# Altium PCB Carrier_Board_pcb.PcbDoc (part 1 of 2)
Units mm, origin at the board's own origin, x right, y up, seen from the top; angles counter-clockwise.
Board outline 152.4 x 101.6 mm, 4 copper layers (Top Layer, Power, Ground, Bottom Layer), stack 0.603 mm thick; 85 components, 79 nets, 632 pads, 232 vias.
Unrouted connection lines stored in the file: 1.
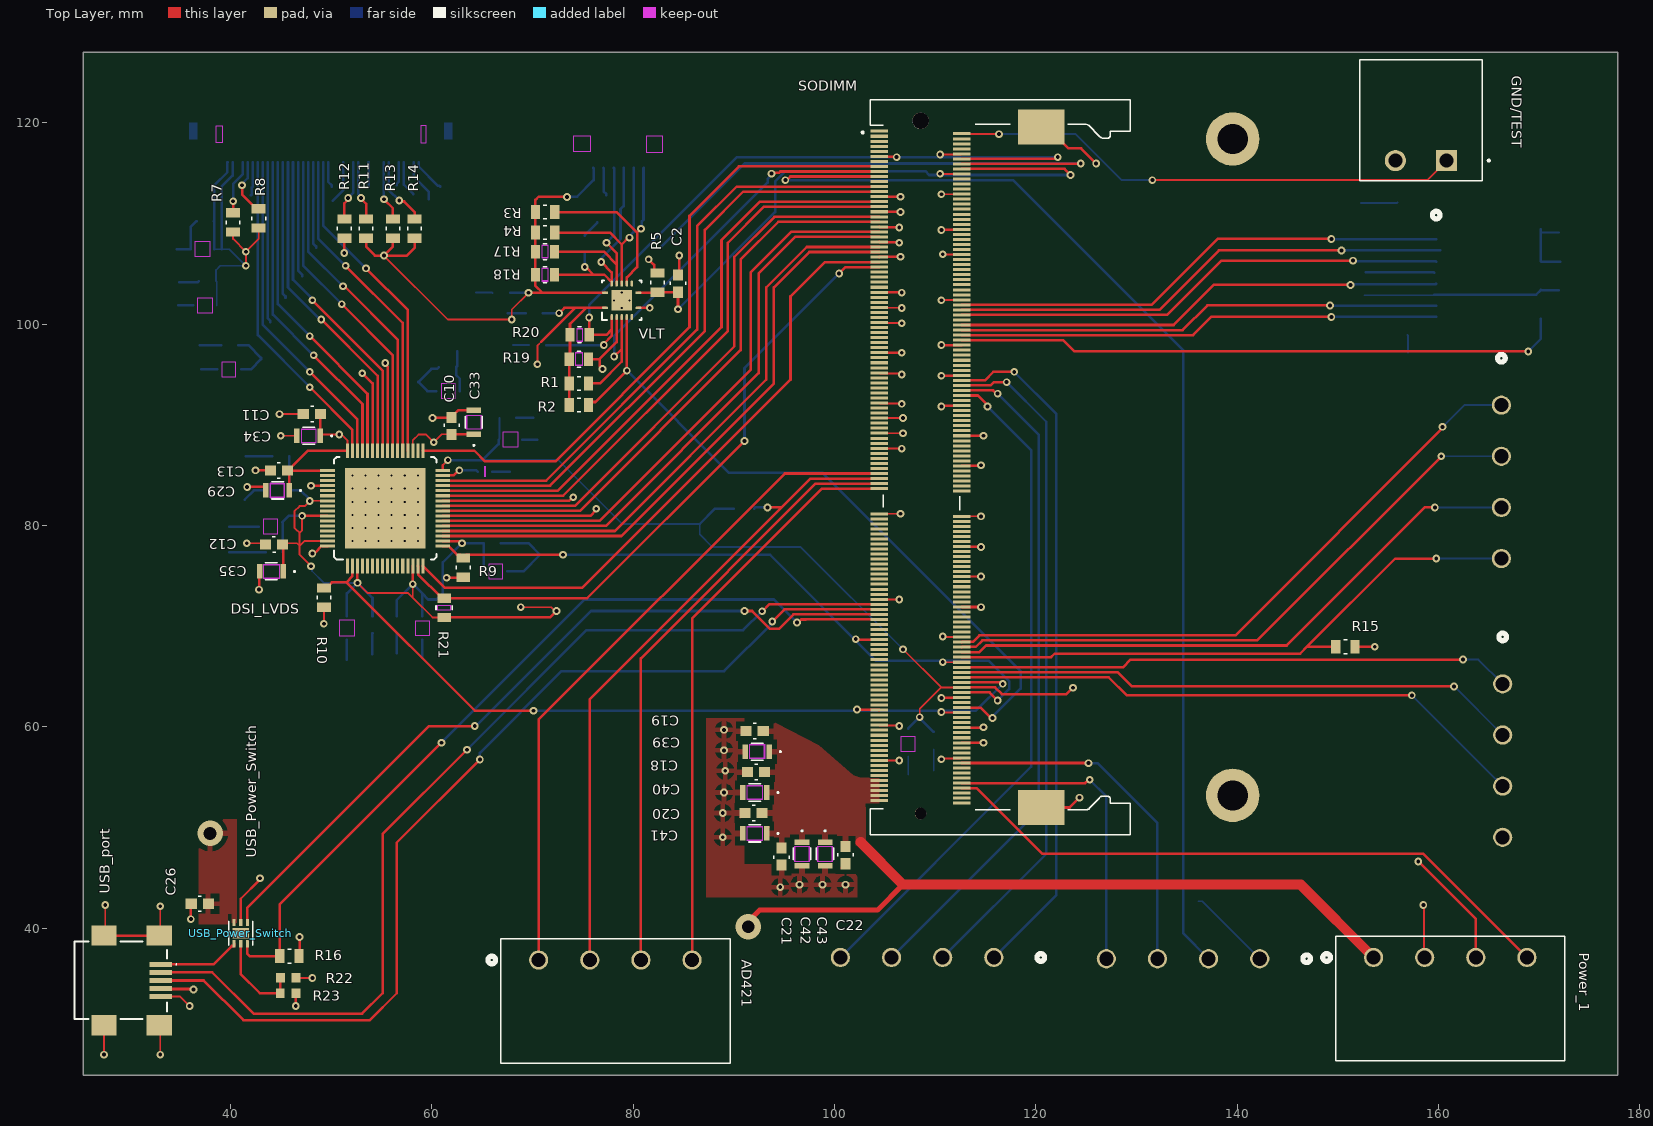
[diagram p0: Top Layer view]
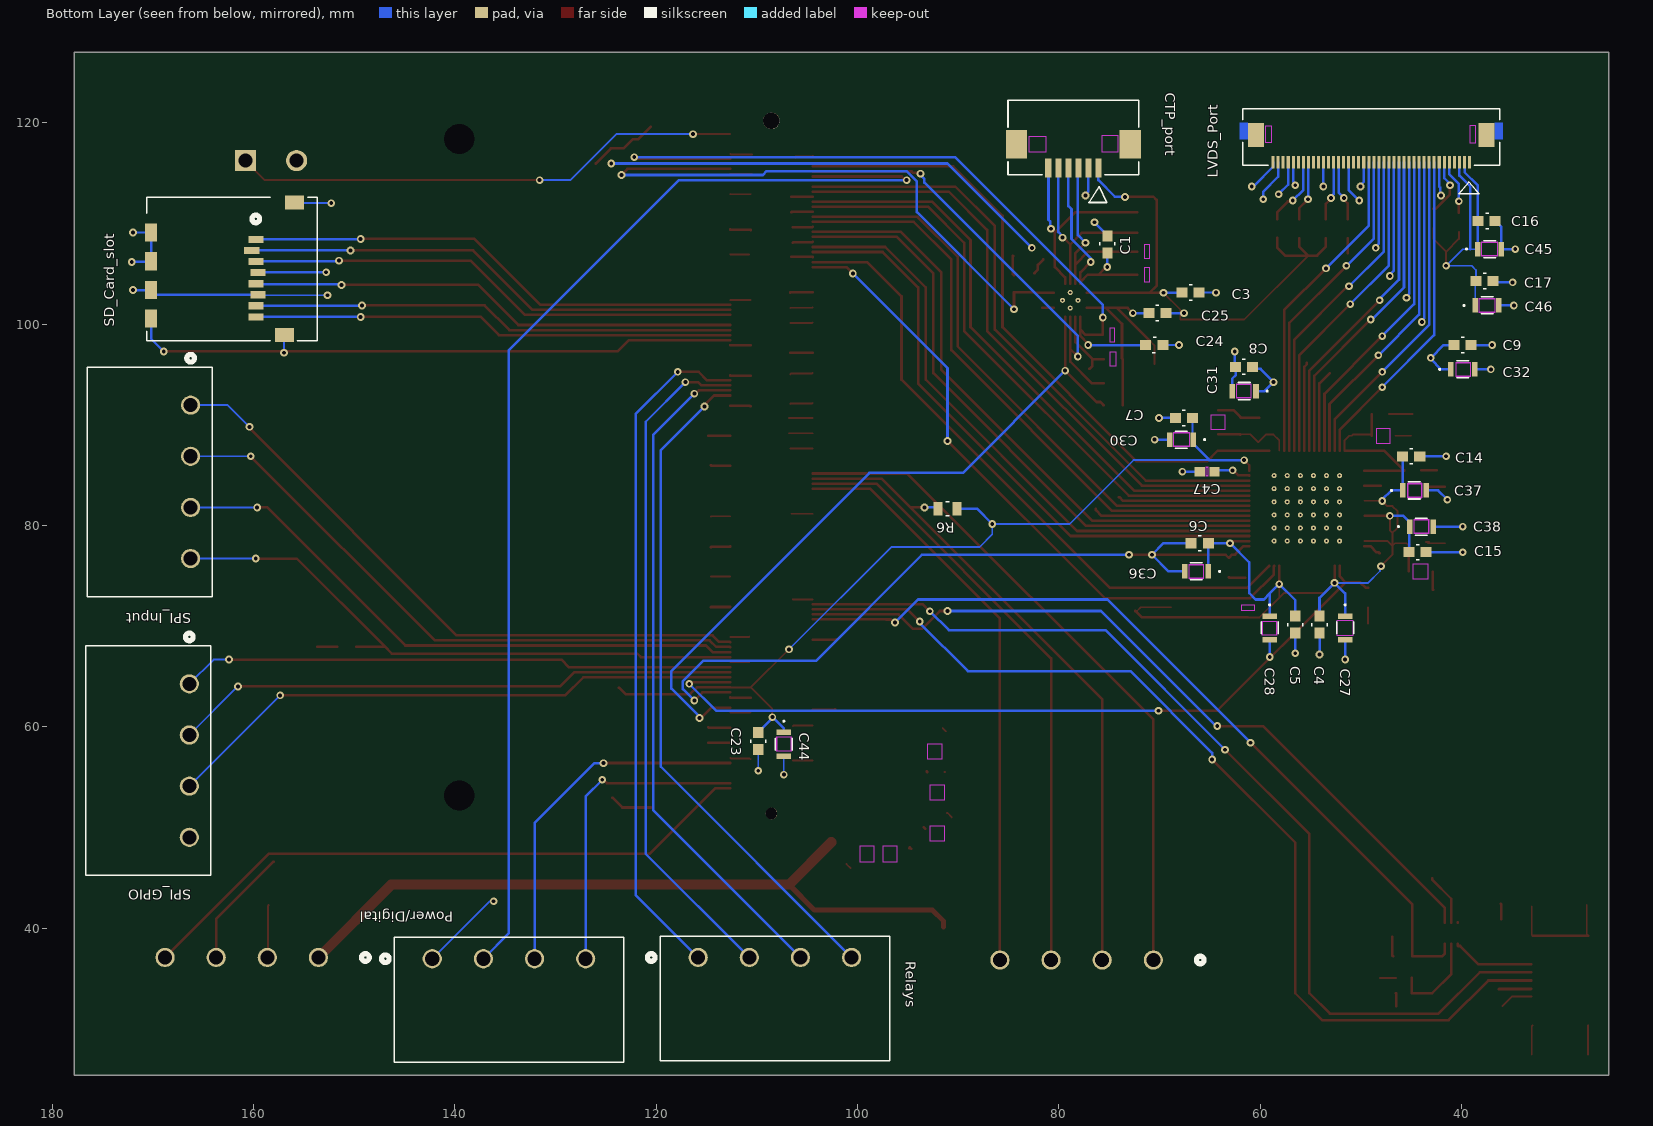
[diagram p1: Bottom Layer view, seen from below]
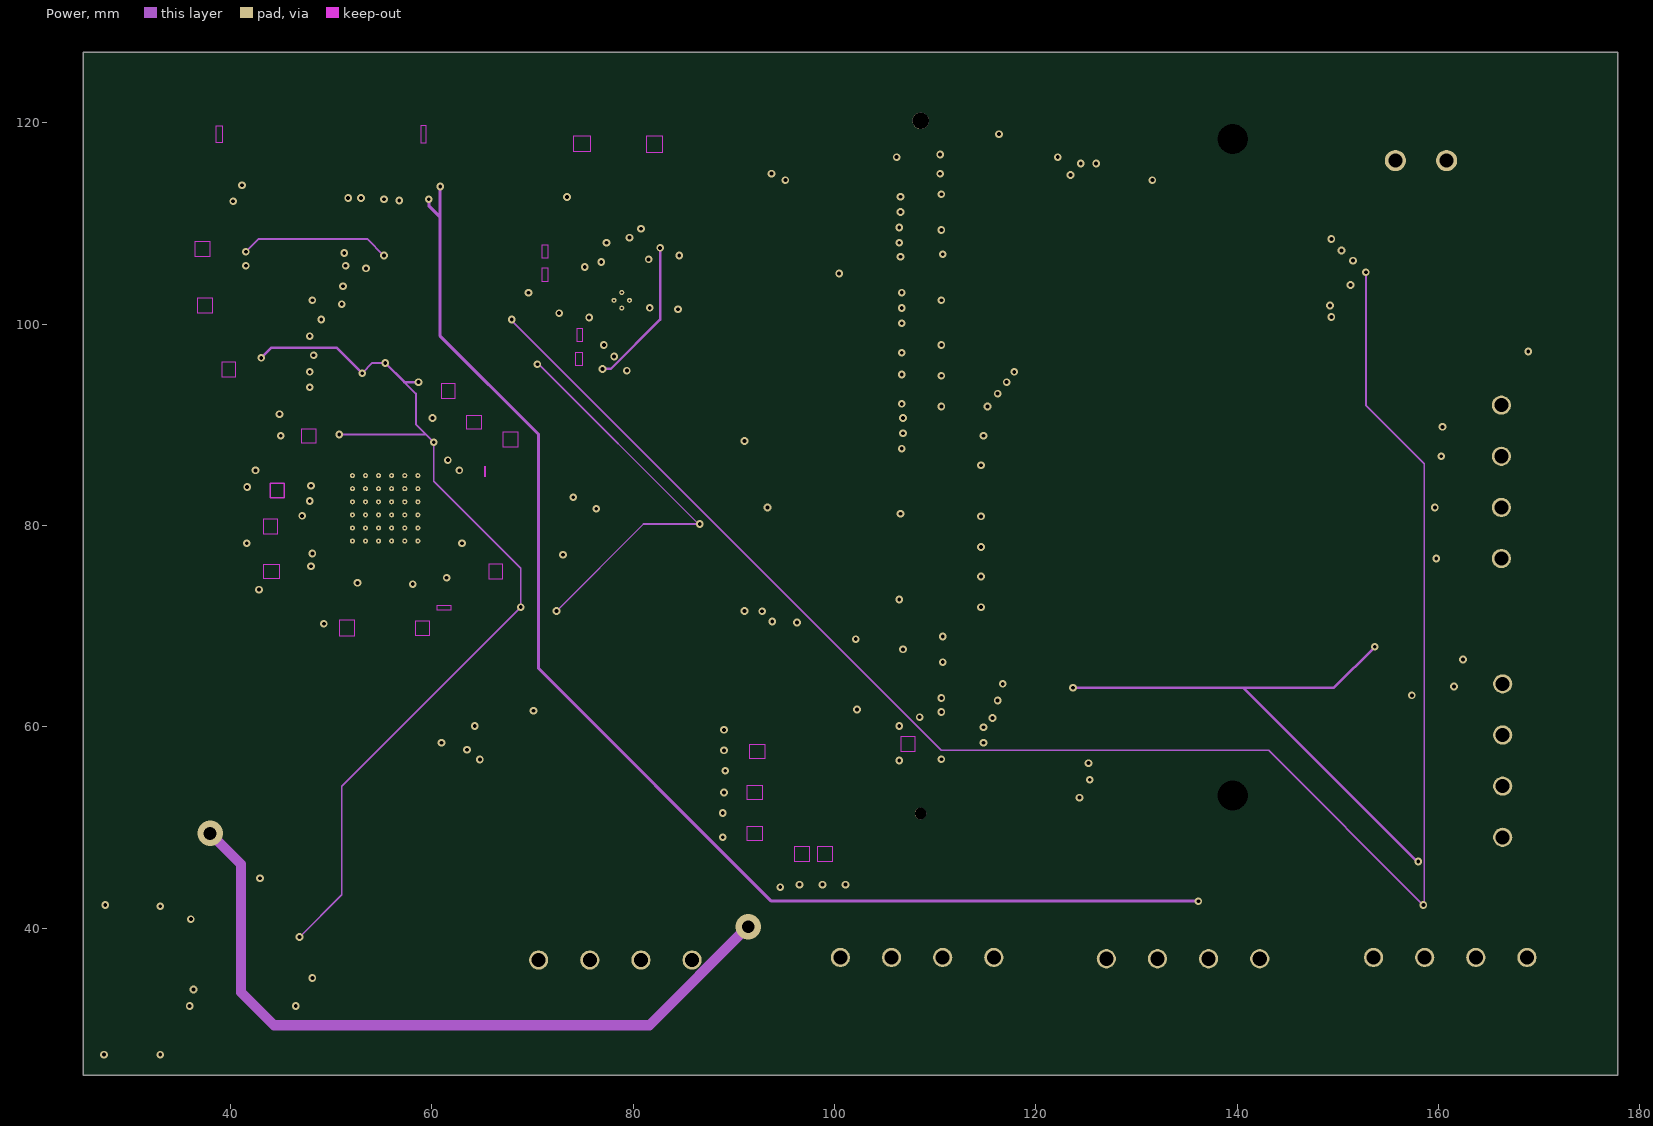
[diagram p2: Power]
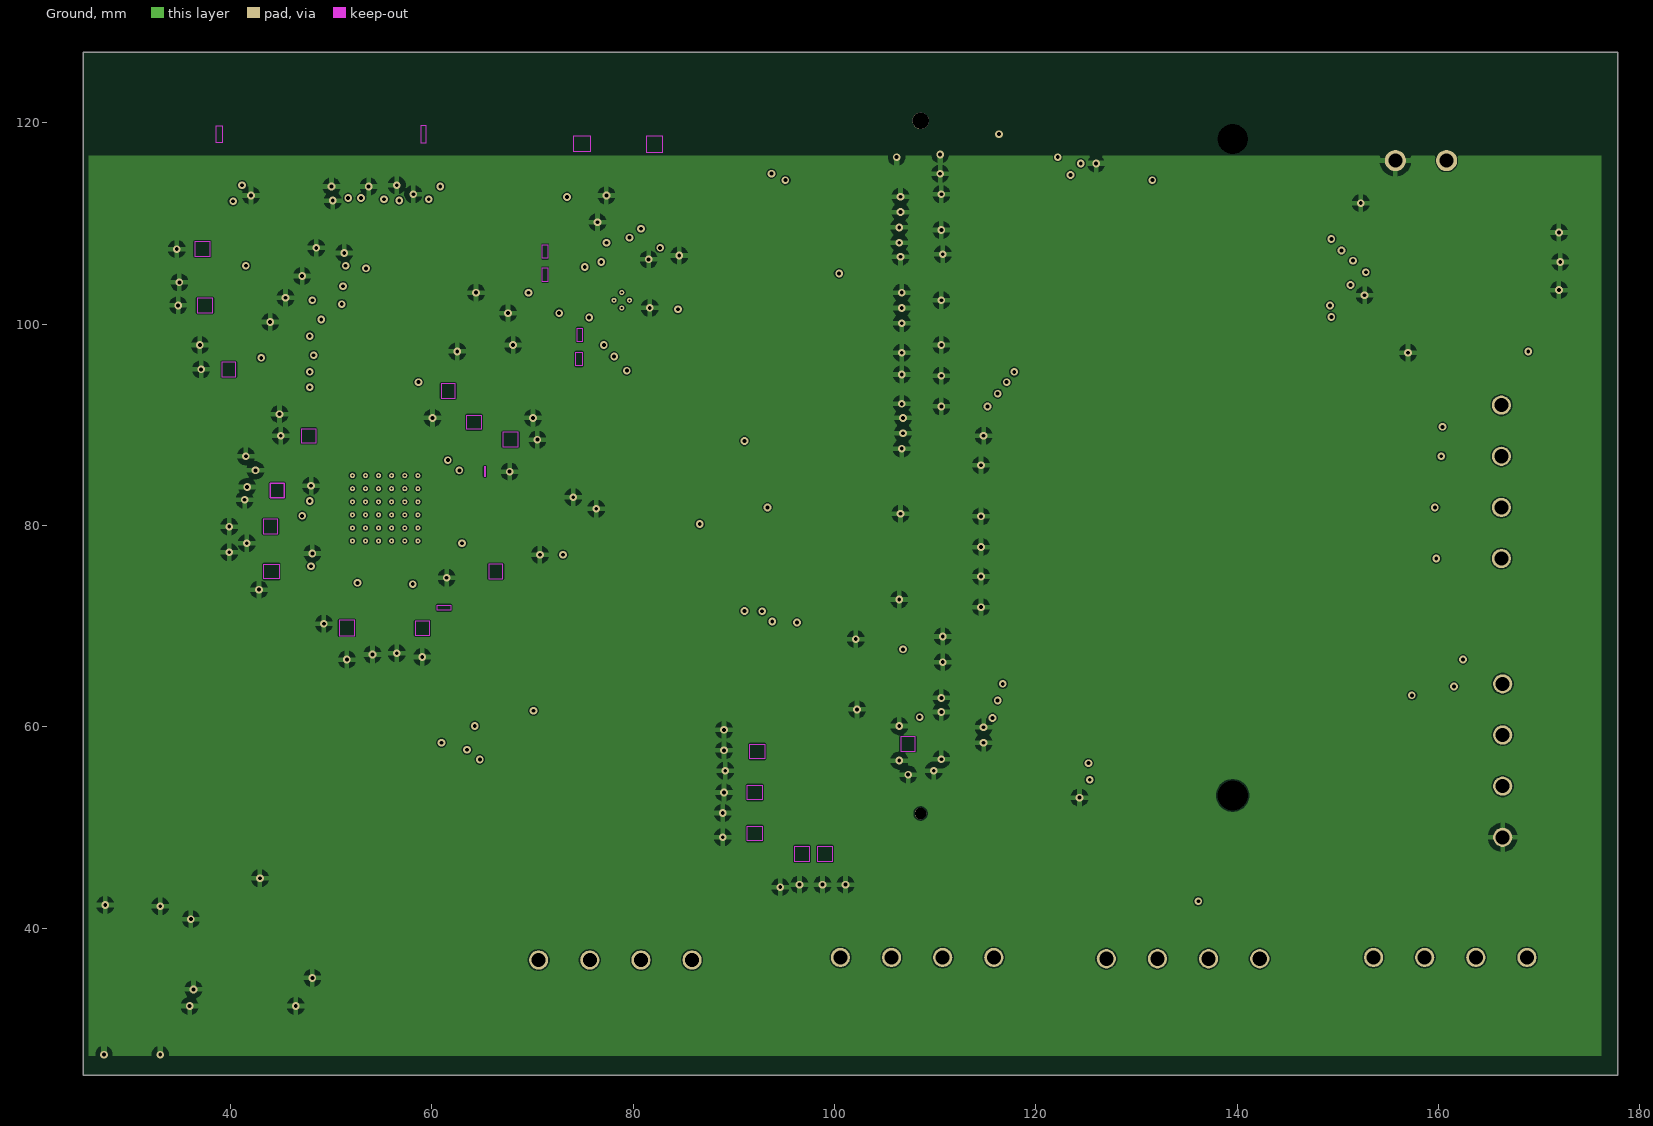
[diagram p3: Ground]
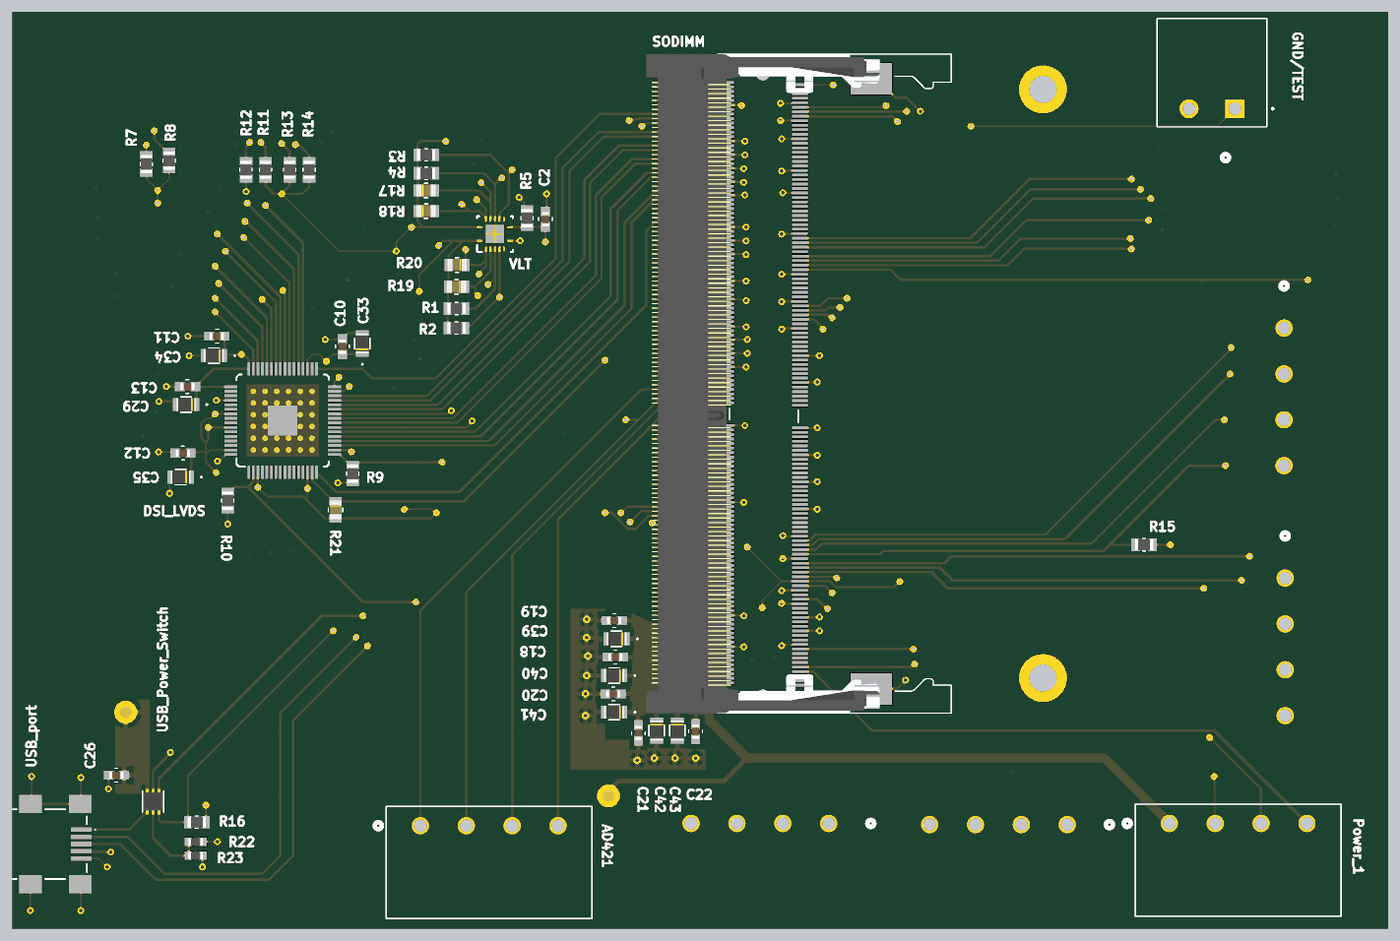
[diagram p5: 3D render of the assembled board from above, using the file's embedded part models]
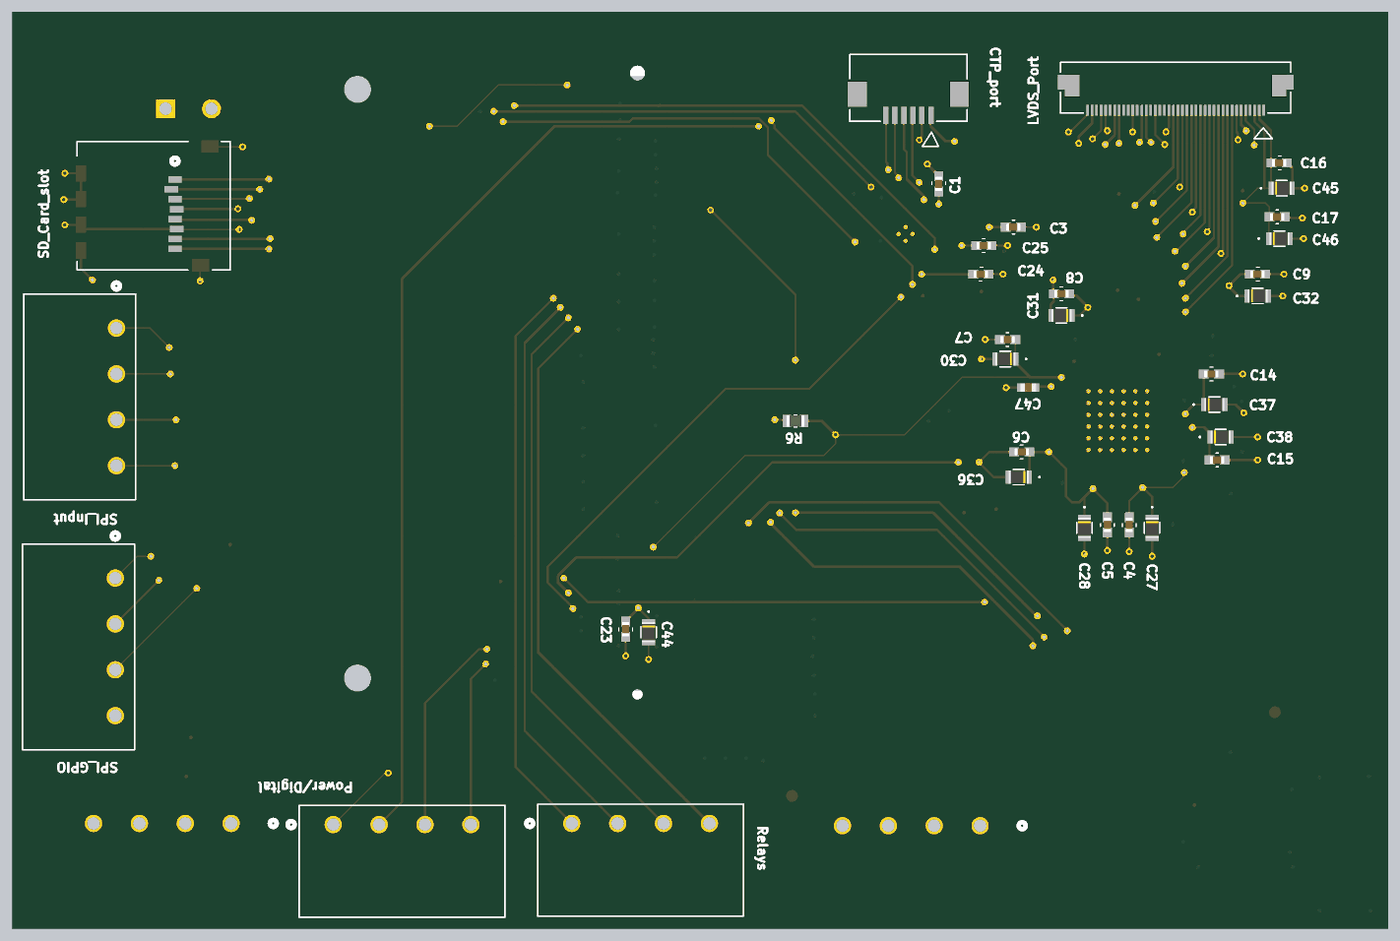
[diagram p6: 3D render of the assembled board from below, using the file's embedded part models]

## Layer stack, top to bottom
Top Solder: solder mask 0.0102, Solder Resist, Dk 3.5
Top Layer: signal copper 0.0356
Dielectric 2: prepreg 0.0711, PP-006, Dk 4.1
Power: signal copper 0.035
Dielectric 1: dielectric 0.32, FR-4, Dk 4.8
Ground: signal copper 0.035
Dielectric 3: prepreg 0.0711, PP-006, Dk 4.1
Bottom Layer: signal copper 0.0356
Bottom Solder: solder mask 0.0102, Solder Resist, Dk 3.5

## Board outline
25.4,25.4 177.8,25.4 177.8,127 25.4,127

## Design rules (kind name [scope] priority, off if disabled: settings)
Clearance Clearance_PolyTopGnd [InNamedPolygon('TOP-GND') OR InNamedPolygon('IL1-PWR') OR InNamedPolygon('IL2-GND') OR InNamedPolygon('BOT-GND')] p1: gap=0.508 ignorepadtopadclearanceinfootprint=FALSE
Clearance [All] p2: gap=0.127 ignorepadtopadclearanceinfootprint=FALSE
ComponentClearance [All] p1 off: gap=0.254 collisioncheckmode=3 verticalgap=0.254 showdistances=FALSE
DiffPairsRouting [All] p1: maxlimit=0.254 minlimit=0.127 mostfreqgap=0.254 toplayer_minwidth=0.127 toplayer_maxwidth=0.381 toplayer_prefwidth=0.254 midlayer1_minwidth=0.127 midlayer1_maxwidth=0.381 midlayer1_prefwidth=0.254 midlayer2_minwidth=0.127 midlayer2_maxwidth=0.381 midlayer2_prefwidth=0.254 bottomlayer_minwidth=0.127 bottomlayer_maxwidth=0.381 bottomlayer_prefwidth=0.254 maxuncoupledlength=12.7
FabricationTestPointUsage TestPointUsage [All] p2: valid=0 allowmultiple=FALSE
FabricationTestpoint Testpoint [All] p2: side=3 testpointundercomponent=TRUE minsize=1.016 maxsize=2.54 preferedsize=1.524 minholesize=0.508 maxholesize=1.016 preferedholesize=0.813 testpointgrid=0.025 allowsidetop=TRUE allowsidebottom=TRUE usegrid=TRUE gridtolerance=0
Height [All] p1 off: minheight=0 maxheight=25.4 prefheight=12.7
HoleSize HoleSize_FIDUCIAL [(InPadClass('FIDUCIAL ROUND'))] p1: absolutevalues=TRUE maxlimit=2.54 minlimit=0 maxpercent=80.000 minpercent=20.000
HoleSize [All] p2: absolutevalues=TRUE maxlimit=20.32 minlimit=0.3 maxpercent=80.000 minpercent=20.000
MatchedLengths MatchedLengths_CAM [InNetClass('LVDSCAM0')] p1: tolerance=0.254 checknetsindiffpair=FALSE checkdiffpairvsdiffpair=TRUE checkxsignals=TRUE checkothers=TRUE
PlaneClearance [All] p1: clearance=0.635
PlaneConnect [All] p1: planeconnectstyle=Direct reliefexpansion=0.508 reliefentries=4 reliefconductorwidth=0.381 reliefairgap=0.254
PolygonConnect [All] p1: connectstyle=Relief reliefconductorwidth=0.508 reliefentries=4 polygonreliefangle="90 Angle" airgapwidth=0.508
RoutingVias [All] p1: holewidth=0.711 width=1.27 viastyle="Through Hole" minholewidth=0.711 minwidth=1.27 maxholewidth=0.711 maxwidth=1.27
SilkToSolderMaskClearance SilkscreenOverComponentPads [IsPad] p2: minsilkscreentomaskgap=0.254 clearancetoexposedcopper=TRUE
SolderMaskExpansion [All] p1: expansion=0.038 istentingtop=FALSE
SupplyNets "Schematic Supply Nets_1" [InNet('GND')] p1: voltage=0.000
Width [All] p1: maxlimit=12.7 minlimit=0.127 preferedwidth=0.178
24 further rules are at their usual default settings.

## Components (designator, comment, footprint, x,y, rotation, side; value= is the part's Value field where it differs from the comment)
AD421 "1757268" CONN_1757268_PXC 70.612,36.83 r0 top
C1 "100n" CAPC1608X90 75.184,107.911 r270 bottom
C2 "100n" CAPC1608X90 84.455,104.013 r270 top
C3 "100n" CAPC1608X90 66.929,103.124 r0 bottom
C4 "100n" CAPC1608X90 54.105,70.146 r270 bottom
C5 "100n" CAPC1608X90 56.515,70.143 r270 bottom
C6 "100n" CAPC1608X90 66.001,78.232 r0 bottom
C7 "100n" CAPC1608X90 67.564,90.678 r0 bottom
C8 "100n" CAPC1608X90 61.595,95.758 r0 bottom
C9 "100n" CAPC1608X90 39.91,97.917 r180 bottom
C10 "100n" CAPC1608X90 61.976,89.877 r90 top
C11 "100n" CAPC1608X90 48.08,91.059 r180 top
C12 "100n" CAPC1608X90 44.323,78.105 r180 top
C13 "100n" CAPC1608X90 44.831,85.471 r180 top
C14 "100n" CAPC1608X90 45,86.865 r180 bottom
C15 "100n" CAPC1608X90 44.362,77.343 r180 bottom
C16 "100n" CAPC1608X90 37.504,110.236 r0 bottom
C17 "100n" CAPC1608X90 37.719,104.267 r0 bottom
C18 "100n" CAPC1608X90 92.202,55.499 r180 top
C19 "100n" CAPC1608X90 92.075,59.563 r180 top
C20 "100n" CAPC1608X90 91.948,51.435 r180 top
C21 "100n" CAPC1608X90 94.742,47.117 r270 top
C22 "100n" CAPC1608X90 101.092,47.244 r270 top
C23 "100n" CAPC1608X90 109.855,58.586 r270 bottom
C24 "100n" CAPC1608X90 70.524,97.917 r0 bottom
C25 "100n" CAPC1608X90 70.192,101.092 r0 bottom
C26 "100n" CAPC1608X90 36.957,42.418 r0 top
C27 "10u" CAP_2012_TDK 51.562,69.818 r270 bottom
C28 "10u" CAP_2012_TDK 59.055,69.815 r270 bottom
C29 "10u" CAP_2012_TDK 44.672,83.475 r180 top
C30 "10u" CAP_2012_TDK 67.818,88.519 r0 bottom
C31 "10u" CAP_2012_TDK 61.595,93.345 r0 bottom
C32 "10u" CAP_2012_TDK 39.878,95.504 r180 bottom
C33 "10u" CAP_2012_TDK 64.177,90.244 r90 top
C34 "10u" CAP_2012_TDK 47.752,88.9 r180 top
C35 "10u" CAP_2012_TDK 44.069,75.438 r180 top
C36 "10u" CAP_2012_TDK 66.329,75.438 r0 bottom
C37 "10u" CAP_2012_TDK 44.672,83.475 r180 bottom
C38 "10u" CAP_2012_TDK 43.977,79.883 r180 bottom
C39 "10u" CAP_2012_TDK 92.329,57.531 r180 top
C40 "10u" CAP_2012_TDK 92.075,53.467 r180 top
C41 "10u" CAP_2012_TDK 92.075,49.403 r180 top
C42 "10u" CAP_2012_TDK 96.774,47.371 r270 top
C43 "10u" CAP_2012_TDK 99.06,47.371 r270 top
C44 "10u" CAP_2012_TDK 107.315,58.258 r270 bottom
C45 "10u" CAP_2012_TDK 37.211,107.442 r180 bottom
C46 "10u" CAP_2012_TDK 37.465,101.854 r180 bottom
C47 "1u" CAPC17595_90N_KEM 65.278,85.344 r180 bottom
CTP_port "522710679" CON_522710679_MOL 78.551,118.556 r0 bottom locked
DSI_LVDS "SN65DSI83TPAPRQ1" PAP0064Q_N 55.362,81.697 r90 top locked
GND/TEST "1923869" PHOENIX_1923869 164.338,126.238 r180 top
LVDS_Port "541044031" CON_541044031_MOL 48.962,118.576 r0 bottom locked
Power/Digital "1757268" CONN_1757268_PXC 142.24,36.957 r180 bottom
Power_1 "1757268" CONN_1757268_PXC 153.543,37.084 r0 top
R1 "10k" RESC2012X60N 74.61,94.107 r180 top
R2 "10k" RESC2012X60N 74.61,91.948 r180 top
R3 "10k" RESC2012X60N 71.247,111.125 r180 top
R4 "10k" RESC2012X60N 71.247,109.093 r180 top
R5 "10k" RESC2012X60N 82.423,104.113 r90 top
R6 "10k" RESC2012X60N 91.059,81.661 r180 bottom
R7 "10k" RESC2012X60N 40.259,110.109 r90 top
R8 "10k" RESC2012X60N 42.799,110.49 r90 top
R9 "10k" RESC2012X60N 63.119,75.819 r90 top
R10 "10k" RESC2012X60N 49.276,72.832 r90 top
R11 "10k" RESC2012X60N 53.467,109.474 r90 top
R12 "10k" RESC2012X60N 51.308,109.474 r90 top
R13 "10k" RESC2012X60N 56.134,109.474 r90 top
R14 "10k" RESC2012X60N 58.293,109.474 r90 top
R15 "10k" RESC2012X60N 150.749,67.945 r180 top
R16 "10k" RESC2012X60N 45.847,37.211 r0 top
R17 "4.7k" RES_RC0805_YAG 71.247,107.188 r0 top
R18 "4.7k" RES_RC0805_YAG 71.247,104.902 r0 top
R19 "4.7k" RES_RC0805_YAG 74.612,96.52 r180 top
R20 "4.7k" RES_RC0805_YAG 74.676,98.933 r180 top
R21 "4.7k" RES_RC0805_YAG 61.214,71.819 r270 top
R22 "100k" RESC1608X55N 45.738,35.052 r0 top
R23 "100k" RESC1608X55N 45.72,33.528 r0 top
Relays "1757268" CONN_1757268_PXC 115.824,37.084 r180 bottom
SD_Card_slot "112A-TAAR-R03" CONN8_-TAAR-R03_ATT 159.766,108.413 r90 bottom
SODIMM "2309407-1" TE_2309407-1 108.549,85.783 r90 top locked
SPI_GPIO "1757268" CONN_1757268_PXC 166.37,64.262 r270 bottom
SPI_Input "1757268" CONN_1757268_PXC 166.243,91.948 r270 bottom
USB_port "651305142821" 651305142821 29.083,34.798 r270 top
USB_Power_Switch "TPS2553DDBVR" DRV6_1P6X1_TEX 41.021,39.497 r90 top
VLT "LSF0204RGYR" RGY0014A 78.867,102.362 r90 top locked

## Footprints (in the part's own frame and the unit in brackets; to place one, negate y for a bottom-side part, rotate by r counter-clockwise, add the part's x,y. Pads: shape width x height; smd on the part's side, far side on the other; paste and mask are expansions set on the pad)
651305142821 [mm]
  rect 0.5x2.25 smd: 1(-1.6,3.975) 2(-0.8,3.975) 3(0,3.975) 4(0.8,3.975) 5(1.6,3.975)
  rect 2x2.5 smd: 6(-4.45,3.85) 7(4.45,3.85) 8(-4.45,-1.65) 9(4.45,-1.65)
  silkscreen extent -3.85,-4.6 3.85,5.6
CAP_2012_TDK [mil]
  rect 21.78x57 smd paste+0 mask+0: 1(-46.39,0) 2(46.39,0)
  Top Layer keep-out region: -30,-30 -30,30 30,30 30,-30
  Keep-Out Layer region: -30,-30 -30,30 30,30 30,-30
  silkscreen extent -93,-34 23,34, body extent -44,-29 44,29, height 49
CAPC1608X90 [mm]
  rect 1.1x1 smd: 1(-0.85,0) 2(0.85,0)
  silkscreen extent -0.21,-0.76 0.09,0.76, body extent -0.8,-0.4 0.8,0.4, height 0.95
CAPC17595_90N_KEM [mm]
  rect 1x0.95 smd paste+0 mask+0: 1(-0.725,0) 2(0.725,0)
  Top Layer keep-out region: -0.064,-0.424 -0.063,0.424 0.064,0.424 0.063,-0.424
  Keep-Out Layer region: -0.064,-0.475 -0.063,0.475 0.064,0.475 0.063,-0.475
  body extent -0.87,-0.48 0.87,0.48, height 0.9
CON_522710679_MOL [mm]
  rect 0.6x1.9 smd paste+0: 1(-2.5,3.05) 2(-1.5,3.05) 3(-0.5,3.05) 4(0.5,3.05) 5(1.5,3.05) 6(2.5,3.05)
  rect 2.1x2.8 smd paste+0 mask+0.076: P1(-5.65,0.7) P2(5.65,0.7)
  Keep-Out Layer region: 2.73,-0.1 2.73,1.5 4.38,1.5 4.38,-0.1
  Keep-Out Layer region: -2.796,-0.138 -2.796,1.462 -4.446,1.462 -4.446,-0.138
  silkscreen extent -6.5,-3.7 6.5,6.48
CON_541044031_MOL [mm]
  rect 0.3x1.2 smd paste+0: 1(-9.75,2.498) 2(-9.25,2.498) 3(-8.75,2.498) 4(-8.25,2.498) 5(-7.75,2.498) 6(-7.25,2.498) 7(-6.75,2.498) 8(-6.25,2.498) 9(-5.75,2.498) 10(-5.25,2.498) 11(-4.75,2.498) 12(-4.25,2.498) 13(-3.75,2.498) 14(-3.25,2.498) 15(-2.75,2.498) 16(-2.25,2.498) 17(-1.75,2.498) 18(-1.25,2.498) 19(-0.75,2.498) 20(-0.25,2.498) 21(0.25,2.498) 22(0.75,2.498) 23(1.25,2.498) 24(1.75,2.498) 25(2.25,2.498) 26(2.75,2.498) 27(3.25,2.498) 28(3.75,2.498) 29(4.25,2.498) 30(4.75,2.498) 31(5.25,2.498) 32(5.75,2.498) 33(6.25,2.498) 34(6.75,2.498) 35(7.25,2.498) 36(7.75,2.498) 37(8.25,2.498) 38(8.75,2.498) 39(9.25,2.498) 40(9.75,2.498)
  rect 1.6x2.4 smd paste+0 mask+0.076: P1(-11.45,-0.202) P2(11.45,-0.202)
  Top Layer region: 12.25,-1.402 13.05,-1.402 13.05,0.198 12.25,0.198
  Top Layer region: -12.25,-1.402 -13.05,-1.402 -13.05,0.198 -12.25,0.198
  Keep-Out Layer region: 10.474,0.554 10.474,-1.146 9.924,-1.146 9.924,0.554
  Keep-Out Layer region: -10.354,0.554 -10.354,-1.146 -9.804,-1.146 -9.804,0.554
  silkscreen extent -12.75,-2.8 12.75,5.65
CONN8_-TAAR-R03_ATT [mil]
  rect 28x59 smd paste+0 mask+0: 1(0,0) 2(-43.31,15.75) 3(-86.61,0) 4(-129.92,-7.87) 5(-173.23,0) 6(-216.54,-7.87) 7(-259.84,0) 8(-303.15,0)
  rect 71x47 smd paste-35.5 mask-35.5: 9(26.61,409.61) 10(-85.59,409.61) 11(-197.8,409.61) 12(-310,409.61)
  rect 55x75 smd paste-37.5 mask-37.5: 13(143.78,-151.65) 14(-373.94,-112.28)
  silkscreen extent -396,-241 165,426
CONN_1757268_PXC [mil]
  round 75 hole 55 paste-99999 mask+0: 1(0,0) 2(200,0) 3(400,0) 4(600,0)
  silkscreen extent -198,-404 748,84
DRV6_1P6X1_TEX [mm]
  rect 0.7x0.3 smd paste-0.15 mask+0: 1(-1.05,0.65) 2(-1.05,0) 3(-1.05,-0.65) 4(1.05,-0.65) 5(1.05,0) 6(1.05,0.65)
  rect 1.016x1.6 smd paste-0.787 mask-0.787: 7(0,0)
  Top Layer region: 0,-0.8 0,-0.8 0,-0.8 0,-0.8 0,-0.8 0,-0.8 0,-0.8 0,-0.8
  Top Layer region: 0,0.8 0,0.8 0,0.8 0,0.8 0,0.8 0,0.8 0,0.8 0,0.8
  silkscreen extent -1.18,-1.18 1.18,1.18, body extent -1.05,-1.05 1.05,1.05, height 0.81
PAP0064Q_N [mm]
  rect 1.45x0.3 smd paste+0: 1(-5.725,3.75) 2(-5.725,3.25) 3(-5.725,2.75) 4(-5.725,2.25) 5(-5.725,1.75) 6(-5.725,1.25) 7(-5.725,0.75) 8(-5.725,0.25) 9(-5.725,-0.25) 10(-5.725,-0.75) 11(-5.725,-1.25) 12(-5.725,-1.75) 13(-5.725,-2.25) 14(-5.725,-2.75) 15(-5.725,-3.25) 16(-5.725,-3.75) 33(5.725,-3.75) 34(5.725,-3.25) 35(5.725,-2.75) 36(5.725,-2.25) 37(5.725,-1.75) 38(5.725,-1.25) 39(5.725,-0.75) 40(5.725,-0.25) 41(5.725,0.25) 42(5.725,0.75) 43(5.725,1.25) 44(5.725,1.75) 45(5.725,2.25) 46(5.725,2.75) 47(5.725,3.25) 48(5.725,3.75)
  rect 0.3x1.45 smd paste+0: 17(-3.75,-5.725) 18(-3.25,-5.725) 19(-2.75,-5.725) 20(-2.25,-5.725) 21(-1.75,-5.725) 22(-1.25,-5.725) 23(-0.75,-5.725) 24(-0.25,-5.725) 25(0.25,-5.725) 26(0.75,-5.725) 27(1.25,-5.725) 28(1.75,-5.725) 29(2.25,-5.725) 30(2.75,-5.725) 31(3.25,-5.725) 32(3.75,-5.725) 49(3.75,5.725) 50(3.25,5.725) 51(2.75,5.725) 52(2.25,5.725) 53(1.75,5.725) 54(1.25,5.725) 55(0.75,5.725) 56(0.25,5.725) 57(-0.25,5.725) 58(-0.75,5.725) 59(-1.25,5.725) 60(-1.75,5.725) 61(-2.25,5.725) 62(-2.75,5.725) 63(-3.25,5.725) 64(-3.75,5.725)
  rect 8x8 smd paste-3.987 mask-3.988: 65(0,0)
  round 0.5 hole 0.203 paste-2539.97 mask+0.051: V(-3.25,3.25) V(-3.25,-1.95) V(-3.25,-0.65) V(-3.25,0.65) V(-3.25,1.95) V(-3.25,-3.25) V(-1.95,3.25) V(-1.95,-1.95) V(-1.95,-0.65) V(-1.95,0.65) V(-1.95,1.95) V(-1.95,-3.25) V(-0.65,3.25) V(-0.65,1.95) V(-0.65,-0.65) V(-0.65,0.65) V(-0.65,-1.95) V(-0.65,-3.25) V(0.65,3.25) V(0.65,1.95) V(0.65,-0.65) V(0.65,0.65) V(0.65,-1.95) V(0.65,-3.25) V(1.95,3.25) V(1.95,-1.95) V(1.95,-0.65) V(1.95,0.65) V(1.95,1.95) V(1.95,-3.25) V(3.25,3.25) V(3.25,-1.95) V(3.25,-0.65) V(3.25,0.65) V(3.25,1.95) V(3.25,-3.25)
  silkscreen extent -5.1,-5.13 5.1,5.1
PHOENIX_1923869 [mm]
  rect 2.1x2.1 / inner round 2.1 / far side rect 2.1x2.1 hole 1.4: 01(3.54,10)
  round 2.1 hole 1.4: 02(8.62,10)
  silkscreen extent -0.75,0 12.16,12
RES_RC0805_YAG [mil]
  rect 36x53 smd paste+0 mask+0: 1(-37.5,0) 2(37.5,0)
  Top Layer keep-out region: -10,-24.5 -10,24.5 10,24.5 10,-24.5
  Keep-Out Layer region: -10,-26.5 -10,26.5 10,26.5 10,-26.5
  silkscreen extent -7,-32 7,32, body extent -41,-26 41,26, height 24
RESC1608X55N [mm]
  rect 0.87x0.93 smd paste+0 mask+0.102: 1(-0.78,0) 2(0.78,0)
  body extent -0.8,-0.4 0.8,0.4, height 0.55
RESC2012X60N [mm]
  rect 0.92x1.38 smd: 1(-0.955,0) 2(0.955,0)
  silkscreen extent -0.17,-0.68 0.17,0.68, body extent -1,-0.63 1,0.63, height 0.6
RGY0014A [mm]
  oval 0.24x0.6 smd paste-0.102 mask+0.051: 1(-0.75,1.65) 7(-0.75,-1.65) 8(0.75,-1.65) 14(0.75,1.65)
  oval 0.6x0.24 smd paste-0.102 mask+0.051: 2(-1.65,1) 3(-1.65,0.5) 4(-1.65,0) 5(-1.65,-0.5) 6(-1.65,-1) 9(1.65,-1) 10(1.65,-0.5) 11(1.65,0) 12(1.65,0.5) 13(1.65,1)
  rect 2.05x2.05 smd paste-1.025 mask+0.051: 15(0,0)
  round 0.5 hole 0.203 paste-2539.97 mask+0.051: V(-0.775,0) V(0,0.775) V(0,-0.775) V(0.775,0)
  silkscreen extent -1.98,-1.97 1.98,1.97
TE_2309407-1 [mm]
  rect 0.3x1.75 smd paste+0 mask+0.102: 1(33.375,4.1) 2(33.125,-4.1) 3(32.875,4.1) 4(32.625,-4.1) 5(32.375,4.1) 6(32.125,-4.1) 7(31.875,4.1) 8(31.625,-4.1) 9(31.375,4.1) 10(31.125,-4.1) 11(30.875,4.1) 12(30.625,-4.1) 13(30.375,4.1) 14(30.125,-4.1) 15(29.875,4.1) 16(29.625,-4.1) 17(29.375,4.1) 18(29.125,-4.1) 19(28.875,4.1) 20(28.625,-4.1) 21(28.375,4.1) 22(28.125,-4.1) 23(27.875,4.1) 24(27.625,-4.1) 25(27.375,4.1) 26(27.125,-4.1) 27(26.875,4.1) 28(26.625,-4.1) 29(26.375,4.1) 30(26.125,-4.1) 31(25.875,4.1) 32(25.625,-4.1) 33(25.375,4.1) 34(25.125,-4.1) 35(24.875,4.1) 36(24.625,-4.1) 37(24.375,4.1) 38(24.125,-4.1) 39(23.875,4.1) 40(23.625,-4.1) 41(23.375,4.1) 42(23.125,-4.1) 43(22.875,4.1) 44(22.625,-4.1) 45(22.375,4.1) 46(22.125,-4.1) 47(21.875,4.1) 48(21.625,-4.1) 49(21.375,4.1) 50(21.125,-4.1) 51(20.875,4.1) 52(20.625,-4.1) 53(20.375,4.1) 54(20.125,-4.1) 55(19.875,4.1) 56(19.625,-4.1) 57(19.375,4.1) 58(19.125,-4.1) 59(18.875,4.1) 60(18.625,-4.1) 61(18.375,4.1) 62(18.125,-4.1) 63(17.875,4.1) 64(17.625,-4.1) 65(17.375,4.1) 66(17.125,-4.1) 67(16.875,4.1) 68(16.625,-4.1) 69(16.375,4.1) 70(16.125,-4.1) 71(15.875,4.1) 72(15.625,-4.1) 73(15.375,4.1) 74(15.125,-4.1) 75(14.875,4.1) 76(14.625,-4.1) 77(14.375,4.1) 78(14.125,-4.1) 79(13.875,4.1) 80(13.625,-4.1) 81(13.375,4.1) 82(13.125,-4.1) 83(12.875,4.1) 84(12.625,-4.1) 85(12.375,4.1) 86(12.125,-4.1) 87(11.875,4.1) 88(11.625,-4.1) 89(11.375,4.1) 90(11.125,-4.1) 91(10.875,4.1) 92(10.625,-4.1) 93(10.375,4.1) 94(10.125,-4.1) 95(9.875,4.1) 96(9.625,-4.1) 97(9.375,4.1) 98(9.125,-4.1) 99(8.875,4.1) 100(8.625,-4.1) 101(8.375,4.1) 102(8.125,-4.1) 103(7.875,4.1) 104(7.625,-4.1) 105(7.375,4.1) 106(7.125,-4.1) 107(6.875,4.1) 108(6.625,-4.1) 109(6.375,4.1) 110(6.125,-4.1) 111(5.875,4.1) 112(5.625,-4.1) 113(5.375,4.1) 114(5.125,-4.1) 115(4.875,4.1) 116(4.625,-4.1) 117(4.375,4.1) 118(4.125,-4.1) 119(3.875,4.1) 120(3.625,-4.1) 121(3.375,4.1) 122(3.125,-4.1) 123(2.875,4.1) 124(2.625,-4.1) 125(2.375,4.1) 126(2.125,-4.1) 127(1.875,4.1) 128(1.625,-4.1) 129(1.375,4.1) 130(1.125,-4.1) 131(0.875,4.1) 132(0.625,-4.1) 133(0.375,4.1) 134(0.125,-4.1) 135(-0.125,4.1) 136(-0.375,-4.1) 137(-0.625,4.1) 138(-0.875,-4.1) 139(-1.125,4.1) 140(-1.375,-4.1) 141(-1.625,4.1) 142(-1.875,-4.1) 143(-2.125,4.1) 144(-2.375,-4.1) 145(-4.625,4.1) 146(-4.875,-4.1) 147(-5.125,4.1) 148(-5.375,-4.1) 149(-5.625,4.1) 150(-5.875,-4.1) 151(-6.125,4.1) 152(-6.375,-4.1) 153(-6.625,4.1) 154(-6.875,-4.1) 155(-7.125,4.1) 156(-7.375,-4.1) 157(-7.625,4.1) 158(-7.875,-4.1) 159(-8.125,4.1) 160(-8.375,-4.1) 161(-8.625,4.1) 162(-8.875,-4.1) 163(-9.125,4.1) 164(-9.375,-4.1) 165(-9.625,4.1) 166(-9.875,-4.1) 167(-10.125,4.1) 168(-10.375,-4.1) 169(-10.625,4.1) 170(-10.875,-4.1) 171(-11.125,4.1) 172(-11.375,-4.1) 173(-11.625,4.1) 174(-11.875,-4.1) 175(-12.125,4.1) 176(-12.375,-4.1) 177(-12.625,4.1) 178(-12.875,-4.1) 179(-13.125,4.1) 180(-13.375,-4.1) 181(-13.625,4.1) 182(-13.875,-4.1) 183(-14.125,4.1) 184(-14.375,-4.1) 185(-14.625,4.1) 186(-14.875,-4.1) 187(-15.125,4.1) 188(-15.375,-4.1) 189(-15.625,4.1) 190(-15.875,-4.1) 191(-16.125,4.1) 192(-16.375,-4.1) 193(-16.625,4.1) 194(-16.875,-4.1) 195(-17.125,4.1) 196(-17.375,-4.1) 197(-17.625,4.1) 198(-17.875,-4.1) 199(-18.125,4.1) 200(-18.375,-4.1) 201(-18.625,4.1) 202(-18.875,-4.1) 203(-19.125,4.1) 204(-19.375,-4.1) 205(-19.625,4.1) 206(-19.875,-4.1) 207(-20.125,4.1) 208(-20.375,-4.1) 209(-20.625,4.1) 210(-20.875,-4.1) 211(-21.125,4.1) 212(-21.375,-4.1) 213(-21.625,4.1) 214(-21.875,-4.1) 215(-22.125,4.1) 216(-22.375,-4.1) 217(-22.625,4.1) 218(-22.875,-4.1) 219(-23.125,4.1) 220(-23.375,-4.1) 221(-23.625,4.1) 222(-23.875,-4.1) 223(-24.125,4.1) 224(-24.375,-4.1) 225(-24.625,4.1) 226(-24.875,-4.1) 227(-25.125,4.1) 228(-25.375,-4.1) 229(-25.625,4.1) 230(-25.875,-4.1) 231(-26.125,4.1) 232(-26.375,-4.1) 233(-26.625,4.1) 234(-26.875,-4.1) 235(-27.125,4.1) 236(-27.375,-4.1) 237(-27.625,4.1) 238(-27.875,-4.1) 239(-28.125,4.1) 240(-28.375,-4.1) 241(-28.625,4.1) 242(-28.875,-4.1) 243(-29.125,4.1) 244(-29.375,-4.1) 245(-29.625,4.1) 246(-29.875,-4.1) 247(-30.125,4.1) 248(-30.375,-4.1) 249(-30.625,4.1) 250(-30.875,-4.1) 251(-31.125,4.1) 252(-31.375,-4.1) 253(-31.625,4.1) 254(-31.875,-4.1) 255(-32.125,4.1) 256(-32.375,-4.1) 257(-32.625,4.1) 258(-32.875,-4.1) 259(-33.125,4.1) 260(-33.375,-4.1)
  rect 3.5x4.6 smd paste+0 mask+0.102: SH1(33.8,-12) SH2(-33.8,-12)
  round 1.15 hole 1.15 unplated mask+0: ""(-34.4,0)
  round 1.65 hole 1.65 unplated mask+0: ""(34.4,0)
  silkscreen extent -36.5,-20.85 36.5,5.85, body extent -36.5,-12.93 36.5,12.93, height 4.25

## Part data
AD421 Power/Digital Power_1 Relays SPI_GPIO SPI_Input: library part CMP-085-000000-1, "p", Manufacturer_Name="Phoenix Contact", Copyright="Copyright (C) 2026 Ultra Librarian. All rights reserved.", Design Item ID=1757268, Manufacturer_Part_Number=1757268, RefDes=RefDes, Source=1757268.SchLib, Type=Type
C1 C2 C3 C4 C5 C6 C7 C8 C9 C10 C11 C12 C13 C14 C15 C16 C17 C18 C19 C20 C21 C22 C23 C24 C25 C26: library part CMP-001-00083-1, "Capacitor, Ceramic, Cap, .100uF, Tol 10%, SMT, 16V, X7R", Case/Package="603-2 KEMET", Check_prices=https://www.snapeda.com/parts/C0603C104K4RACTU/KEMET/view-part/?ref=eda, Component Type=Standard, Design Item ID=C0603C104K4RACTU, MF=KEMET, MP=C0603C104K4RACTU, Pins=2, SnapEDA_Link=https://www.snapeda.com/parts/C0603C104K4RACTU/KEMET/view-part/?ref=snap, Source=C0603C104K4RACTU.SchLib
C27 C28 C29 C30 C31 C32 C33 C34 C35 C36 C37 C38 C39 C40 C41 C42 C43 C44 C45 C46: library part CMP-001-00096-1, "Description", Manufacturer_Name=TDK, Manufacturer_Part_Number=C2012X6S1C106K085AC, Copyright="Copyright (C) 2025 Ultra Librarian. All rights reserved.", Design Item ID=C2012X6S1C106K085AC, Source=C2012X6S1C106K085AC.SchLib
C47: library part CMP-001-00086-1, "SMD Comm X7R, Ceramic, 1 uF, 10%, 16 VDC, X7R, SMD, MLCC, Temperature Stable, Class II, 0603", Manufacturer_Name=Kemet, Manufacturer_Part_Number=C0603C105K4RACTU, Copyright="Copyright (C) 2026 Ultra Librarian. All rights reserved.", Design Item ID=C0603C105K4RACTU, Source=C0603C105K4RACTU.SchLib
CTP_port: library part CMP-002-00081-1, "Easy-On FFC/FPC Connector, 1.00mm Pitch, Slider Series, Right-Angle, Bottom Contact, 3.00mm Height, 6 Circuits, Tin-Bismuth Plating", Manufacturer_Name="Molex Connector Corporation", Copyright="Copyright (C) 2026 Ultra Librarian. All rights reserved.", Design Item ID=522710679, Manufacturer_Part_Number=522710679, RefDes=RefDes, Source=522710679.SchLib, Type=Type
DSI_LVDS: library part CMP-044-000000-1, "Automotive single-channel MIPIÂ® DSI to single-link LVDS bridge 64-HTQFP -40 to 105", Manufacturer_Name="Texas Instruments", Copyright="Copyright (C) 2025 Ultra Librarian. All rights reserved.", Design Item ID=SN65DSI83TPAPRQ1, Manufacturer_Part_Number=SN65DSI83TPAPRQ1, RefDes=RefDes, Source=SN65DSI83TPAPRQ1.SchLib, Type=TYPE
GND/TEST: library part CMP-002-00074-1, "Pluggable Header 5.08mm 12AWG 320V 16A 2 Position Combicon Power Series", Case/Package=None, Check_prices=https://www.snapeda.com/parts/1923869/Phoenix+Contact/view-part/?ref=eda, Component Type=Standard, Design Item ID=1923869, MF="Phoenix Contact", MP=1923869, Pins=2, SnapEDA_Link=https://www.snapeda.com/parts/1923869/Phoenix+Contact/view-part/?ref=snap, Source=1923869.SchLib
LVDS_Port: library part CMP-002-00084-1, "Easy-On FFC/FPC Connector, 0.50mm Pitch, Slider Series, Right-Angle, Top  Contact, 2.00mm Height, 40 Circuits, Gold Plating", Manufacturer_Name="Molex Connector Corporation", Copyright="Copyright (C) 2025 Ultra Librarian. All rights reserved.", Design Item ID=541044031, Manufacturer_Part_Number=541044031, RefDes=RefDes, Source=541044031.SchLib, Type=Type
R1 R2 R3 R4 R5 R6 R7 R8 R9 R10 R11 R12 R13 R14 R15 R16: library part CMP-009-00177-1, "10 kOhms Â±0.1% 0.125W, 1/8W Chip Resistor 0805 (2012 Metric) - Thin Film", Case/Package="2012 Yageo", Check_prices=https://www.snapeda.com/parts/RT0805BRD0710KL/Yageo/view-part/?ref=eda, Component Type=Standard, Design Item ID=RT0805BRD0710KL, MF=Yageo, MP=RT0805BRD0710KL, Pins=2, SnapEDA_Link=https://www.snapeda.com/parts/RT0805BRD0710KL/Yageo/view-part/?ref=snap, Source=RT0805BRD0710KL.SchLib
R17 R18 R19 R20 R21: library part CMP-009-00179-1, "RES SMD 4.7 k? 1% 1/8W 0805", Manufacturer_Name=Yageo, Manufacturer_Part_Number=RC0805FR-074K7L, Copyright="Copyright (C) 2025 Ultra Librarian. All rights reserved.", Design Item ID=RC0805FR-074K7L, Source=RC0805FR-074K7L.SchLib
R22 R23: library part CMP-009-00181-1, "100 kOhms Â±1% 0.25W, 1/4W Chip Resistor 0603 (1608 Metric) Automotive AEC-Q200, Pulse Withstanding Thick Film", Case/Package="0603-2 TE Connectivity", Check_prices=https://www.snapeda.com/parts/CRGP0603F100K/TE+Connectivity/view-part/?ref=eda, Component Type=Standard, Design Item ID=CRGP0603F100K, MF="TE Connectivity", MP=CRGP0603F100K, Pins=2, SnapEDA_Link=https://www.snapeda.com/parts/CRGP0603F100K/TE+Connectivity/view-part/?ref=snap, Source=CRGP0603F100K.SchLib
SD_Card_slot: library part CMP-041-000000-1, "Description", Copyright="Copyright (C) 2026 Ultra Librarian. All rights reserved.", Design Item ID=112A-TAAR-R03, RefDes=RefDes, Source=112A-TAAR-R03.SchLib, Type=Type
SODIMM: library part CMP-002-00077-1, Case/Package=None, Availability=Unavailable, Component Type=Standard, Design Item ID=2309407-1, MP=2309407-1, Pins=262, Price=None, Source=2309407-1.SchLib
USB_port: library part CMP-053-000000-1, "WR-COM_USB_Mini Type AB_Horizontal_SMT Mini Type AB Horizontal SMT - with Pads", Manufacturer_Name="Wurth Elektronik", Mouser Part Number=710-651305142821, Datasheet Link=https://www.we-online.com/catalog/datasheet/651305142821.pdf, Design Item ID=651305142821, Geometry.Height=4.15mm, Manufacturer_Part_Number=651305142821, Mouser Price/Stock=https://www.mouser.co.uk/ProductDetail/Wurth-Elektronik/651305142821?qs=7gQLVZk5cPlF7bfbuz8kNg%3D%3D, Source=651305142821.SchLib
USB_Power_Switch: library part CMP-011-00013-1, "0.075-1.7A adj. ILIMIT 2.5-6.5V 85m&Omega; USB power switch, active-high, reverse blocking, multi 6-SOT-23 -40 to 125", Manufacturer_Name="Texas Instruments", Copyright="Copyright (C) 2025 Ultra Librarian. All rights reserved.", Design Item ID=TPS2553DDBVR, Manufacturer_Part_Number=TPS2553DDBVR, RefDes=RefDes, Source=TPS2553DDBVR.SchLib, Type=Type
VLT: library part CMP-071-000000-1, "4-Bit Bidirectional Multi-Voltage Level Translator for Open-Drain & Push- Pull 14-VQFN -40 to 125", Manufacturer="Texas Instruments", CompType=IC, Copyright="Copyright (C) 2026 Ultra Librarian. All rights reserved.", Datasheet=https://www.ti.com/lit/gpn/lsf0204, Design Item ID=LSF0204RGYR, Manufacturer_Name="Texas Instruments", Manufacturer_Part_Number=LSF0204RGYR, MountType=SMT, PackageReference=RGY0014A, PartNumber=LSF0204RGYR, RefDes=RefDes, RoHS=Y, Source=LSF0204RGYR.SchLib, Type=TYPE

## Free pads (board coordinates)
  round 5.3 / inner round 0 / far side round 0 hole 3 unplated mask+0.05: 2(139.549,53.183) 2(139.549,118.383)

## Via types
v1: diameter 0.762, hole 0.381, Top Layer to Bottom Layer, 83 vias
v2: diameter 0.762, hole 0.381, Top Layer to Ground, 82 vias
v3: diameter 0.762, hole 0.381, Ground to Bottom Layer, 41 vias
v4: diameter 0.762, hole 0.381, Top Layer to Power, 16 vias
v5: diameter 0.762, hole 0.381, Power to Bottom Layer, 8 vias
v6: diameter 2.54, hole 1.27, Top Layer to Power, 2 vias

## Nets (pads, with @x,y where several pads share a name; then routed paths per layer and width w, separated by ;. In a path a pad name is that pad's centre, name@x,y a point inside that pad or via, vN(x,y) a via of type N, cw(c..) or ccw(c..) an arc to the next point about the centre after c; other vN are vias at no path point)
1.8V_VCC: C4.1 C5.1 C6.1 C7.1 C8.1 C9.1 C10.1 C11.1 C12.1 C13.1 C14.1 C15.1 C23.1 C25.2 C27.1 C28.1 C29.1 C30.1 C31.1 C32.1 C33.1 C34.1 C35.1 C36.1 C37.1 C38.1 C44.1 DSI_LVDS.3 DSI_LVDS.14 DSI_LVDS.18 DSI_LVDS.32 DSI_LVDS.35 DSI_LVDS.40 DSI_LVDS.43 DSI_LVDS.48 DSI_LVDS.49 DSI_LVDS.55 DSI_LVDS.58 DSI_LVDS.63 Power_1.3 R1.2 R2.2 R6.2 R15.1 R16.2 R19.2 R20.2 R21.2 SODIMM.214 VLT.1 | length 474.8
  Top Layer w0.178: C12.1@45.256,78.022 45.466,78.232 46.609,78.232 46.863,77.978 ; v1(47.117,80.947) 47.117,79.51 46.863,79.256 ; v1(48.006,75.946) 46.863,77.089 46.863,77.978 ; C34.1@48.93,88.9 49.057,89.027 v4(50.8,89.027) 50.912,88.915 51.166,88.915 51.614,88.467 51.614,87.424 DSI_LVDS.48@51.612,87.422 ; DSI_LVDS.63@49.637,78.447 47.332,78.447 46.863,77.978 ; DSI_LVDS.55@49.637,82.447 49.623,82.461 47.917,82.461 v1(47.879,82.423) 47.371,81.915 46.863,81.915 46.355,81.407 46.355,79.756 46.482,79.629 46.49,79.629 46.863,79.256 ; v1(52.612,74.295) 53.628,73.279 57.658,73.279 58.112,72.825 ; v1(58.112,74.168) 58.112,72.825 ; DSI_LVDS.35@58.112,87.422 58.112,88.465 58.674,89.027 59.436,89.027 v4(60.198,88.265) 60.999,89.066 C10.1@61.937,89.066 ; R21.2@61.214,70.866 60.071,70.866 58.112,72.825 ; v4(68.834,71.882) 71.855,71.882 72.236,71.501 v4(72.39,71.501) ; v4(70.485,96.012) 70.485,97.855 70.897,98.267 ; v1(106.807,67.691) 110.59,63.908 ; v1(108.458,60.96) 108.458,61.776 110.59,63.908 ; SODIMM.214@112.649,63.908 110.59,63.908 ; 46.863,77.978 46.863,79.256
  Top Layer w0.254: C12.1@45.173,78.105 45.247,78.031 C35.1@45.247,75.438 ; C29.1@45.85,83.475 45.85,85.302 C13.1@45.705,85.447 ; R16.2@46.802,37.211 46.863,37.272 v4(46.863,39.116) ; v1(47.117,80.947) 49.591,80.947 DSI_LVDS.58@49.614,80.97 ; C34.1@48.93,88.9 48.93,89.027 C11.1@48.93,91.059 ; DSI_LVDS.49@49.637,85.447 C13.1@45.705,85.447 ; DSI_LVDS.48@51.612,87.422 47.682,87.422 45.731,85.471 C13.1@45.681,85.471 C13.1@45.705,85.447 ; v1(52.612,74.295) DSI_LVDS.3@52.612,75.972 ; v4(53.086,95.123) 54.112,94.097 DSI_LVDS.43@54.112,87.422 ; v4(55.372,96.139) 55.372,96.002 55.612,95.762 DSI_LVDS.40@55.612,87.422 ; v1(58.112,74.168) DSI_LVDS.14@58.112,75.972 ; DSI_LVDS.18@61.087,78.447 62.708,78.447 62.923,78.232 v1(62.992,78.232) ; DSI_LVDS.32@61.087,85.447 61.087,85.979 v1(61.595,86.487) ; R21.2@61.214,70.866 71.755,70.866 v4(72.39,71.501) ; C10.1@61.976,89.027 62.015,89.066 C33.1@64.177,89.066 ; 70.897,98.267 74.242,101.612 ; v1(72.644,101.092) 73.164,101.612 74.242,101.612 ; R2.2@73.655,91.948 R1.2@73.655,94.107 73.66,94.112 R19.2@73.66,96.52 73.724,96.584 R20.2@73.724,98.933 73.724,100.013 75.323,101.612 ; VLT.1@77.217,101.612 75.323,101.612 ; SODIMM.214@112.649,63.908 115.955,63.908 116.617,63.246 123.041,63.246 123.676,63.881 v4(123.698,63.881) ; R15.1@151.704,67.945 v4(153.67,67.945) ; v4(157.988,46.609) 163.703,40.894 Power_1.3@163.703,37.084 ; 74.242,101.612 75.323,101.612
  Power w0.178: v4(46.863,39.116) 51.054,43.307 51.054,54.102 v4(68.834,71.882) 68.834,75.756 60.198,84.392 v4(60.198,88.265) 59.436,89.027 ; v4(50.8,89.027) 59.436,89.027 ; v4(53.086,95.123) 54.102,96.139 v4(55.372,96.139) ; 57.277,94.234 58.42,93.091 58.42,90.043 59.436,89.027 ; v4(70.485,96.012) 70.612,96.012 v5@86.487,80.137 ; v4(72.39,71.501) 81.026,80.137 v5@86.487,80.137 ; v5(86.614,80.137) v5@86.487,80.137
  Power w0.254: v5(43.053,96.647) 44.069,97.663 50.546,97.663 v4(53.086,95.123) ; v4(55.372,96.139) 57.277,94.234 v5(58.674,94.234) ; v4(123.698,63.881) 140.589,63.881 ; v4(153.67,67.945) 149.606,63.881 140.589,63.881 ; v4(157.988,46.609) 157.861,46.609 140.589,63.881
  Bottom Layer w0.178: v1(48.006,75.946) 48.096,75.856 48.096,75.475 49.276,74.295 v1(52.612,74.295) ; 65.055,86.487 72.58,86.487 78.93,80.137 v5(86.614,80.137) 86.614,79.121 87.884,77.851 96.647,77.851 v1(106.807,67.691) ; C30.1@66.64,88.519 66.714,88.593 C7.1@66.714,90.678
  Bottom Layer w0.254: C9.1@40.76,97.917 41.783,97.917 v5(43.053,96.647) 43.053,96.52 42.037,95.504 C32.1@41.056,95.504 ; C38.1@45.156,80.33 45.794,80.969 v1@47.061,80.969 ; C15.1@45.212,77.343 C38.1@45.212,80.309 ; C14.1@45.847,86.868 C14.1@45.85,86.865 C37.1@45.85,83.475 46.964,83.475 47.879,82.56 v1(47.879,82.423) ; C27.1@51.562,70.996 51.562,73.245 v1(52.612,74.295) 54.105,72.802 C4.1@54.105,70.996 ; C5.1@56.515,70.993 56.515,72.571 v1(58.112,74.168) 59.055,73.225 ; C28.1@59.055,70.993 59.055,73.225 ; C31.1@60.417,93.345 59.563,93.345 v5(58.674,94.234) 58.674,94.265 59.963,95.554 60.541,95.554 C8.1@60.71,95.723 ; v1(61.595,86.487) 65.055,86.487 66.64,88.072 C30.1@66.64,88.519 ; C36.1@65.151,75.438 C6.1@65.151,78.232 v1(62.992,78.232) 61.087,76.327 61.087,73.279 60.452,72.644 59.636,72.644 59.055,73.225 ; C25.2@71.042,101.092 v1(72.644,101.092) ; v5(86.614,80.137) 88.138,81.661 R6.2@89.977,81.661 ; 107.315,59.817 v1(108.458,60.96) ; v1@108.458,60.883 C23.1@109.855,59.486
3.3V_VCC: C3.2 C16.2 C17.2 C45.1 C46.1 CTP_port.1 LVDS_Port.2 LVDS_Port.3 Power_1.2 R3.2 R4.2 R7.1 R8.1 R11.1 R13.1 R14.1 R17.1 R18.1 SD_Card_slot.4 VLT.14 | length 297.4
  Top Layer w0.178: R7.1@40.259,109.154 40.259,108.458 v4(41.529,107.188) ; v1(41.529,105.791) v4(41.529,107.188) ; R8.1@42.799,109.535 42.799,108.458 v4(41.529,107.188) ; v4(55.245,106.807) 61.595,100.457 v4(67.945,100.457) 67.945,101.449 v1(69.608,103.112) ; v4(158.496,42.291) 158.559,42.227 158.559,37.148 Power_1.2@158.623,37.084
  Top Layer w0.254: R11.1@53.467,108.519 53.467,107.696 54.356,106.807 v4(55.245,106.807) ; R13.1@56.134,108.519 56.134,107.696 v4(55.245,106.807) ; R14.1@58.293,108.548 58.293,107.569 57.531,106.807 v4(55.245,106.807) ; v1(69.608,103.112) 70.981,103.112 ; v1@73.406,112.649 70.612,112.649 70.292,112.329 R3.2@70.292,111.125 R4.2@70.292,109.093 70.294,109.091 R17.1@70.294,107.188 R18.1@70.294,104.902 70.294,103.799 70.981,103.112 ; VLT.14@77.217,103.112 70.981,103.112
  Power w0.178: v4(41.529,107.188) 42.799,108.458 53.594,108.458 v4(55.245,106.807) ; v4(67.945,100.457) 67.945,100.33 110.617,57.658 143.129,57.658 v4(158.496,42.291) 158.585,42.38 158.585,86.144 152.781,91.948 v5(152.781,105.156)
  Bottom Layer w0.178: C45.1@38.389,107.442 39.116,107.442 39.878,107.442 v1(41.529,105.791) 38.989,105.791 38.569,105.371 C17.2@38.569,104.267 38.643,104.193 C46.1@38.643,101.854
  Bottom Layer w0.254: C45.1@38.389,107.442 38.389,110.201 C16.2@38.354,110.236 38.404,110.286 38.404,113.799 39.689,115.084 39.689,116.055 LVDS_Port.2@39.712,116.078 ; 39.116,107.442 39.116,113.665 40.212,114.761 LVDS_Port.3@40.212,116.078 ; C3.2@67.779,103.124 67.791,103.112 v1(69.608,103.112) ; v1@73.406,112.649 74.422,112.649 76.073,114.3 76.073,115.484 CTP_port.1@76.051,115.506 ; v5(152.781,105.156) 152.803,105.134 159.544,105.134 SD_Card_slot.4@159.566,105.113
  other v1: 73.433,112.63
AD421_2: AD421.2 R6.1 SODIMM.139 | length 66.5
  Top Layer w0.254: AD421.2@75.692,36.83 75.692,62.738 94.742,81.788 ; v1(93.345,81.788) 94.742,81.788 ; SODIMM.139@104.449,84.658 97.612,84.658 94.742,81.788
  Bottom Layer w0.254: R6.1@92.014,81.661 92.141,81.788 v1(93.345,81.788)
AD421_3: AD421.3 SODIMM.141 | length 60.8
  Top Layer w0.254: AD421.3@80.772,36.83 80.772,66.802 98.128,84.158 SODIMM.141@104.449,84.158
AD421_4: AD421.4 SODIMM.143 | length 57.9
  Top Layer w0.254: AD421.4@85.852,36.83 85.852,70.739 98.771,83.658 SODIMM.143@104.449,83.658
AD421_Clk: AD421.1 SODIMM.137 | length 67.8
  Top Layer w0.254: AD421.1@70.612,36.83 70.612,60.706 95.064,85.158 SODIMM.137@104.449,85.158
Analog_SPI1_GPIO1: SODIMM.206 SPI_GPIO.1 | length 55
  Top Layer w0.254: SODIMM.206@112.649,65.908 128.65,65.908 129.416,66.675 v1(162.433,66.675)
  Bottom Layer w0.178: v1(162.433,66.675) 163.957,66.675 SPI_GPIO.1@166.37,64.262
Analog_SPI1_GPIO2: SODIMM.208 SPI_GPIO.2 | length 56.3
  Top Layer w0.254: SODIMM.208@112.649,65.408 128.143,65.408 129.543,64.008 v1(161.544,64.008)
  Bottom Layer w0.178: v1(161.544,64.008) SPI_GPIO.2@166.37,59.182
Analog_SPI1_GPIO3: SODIMM.210 SPI_GPIO.3 | length 58.2
  Top Layer w0.254: SODIMM.210@112.649,64.908 127.243,64.908 129.032,63.119 v1(157.353,63.119)
  Bottom Layer w0.178: v1(157.353,63.119) SPI_GPIO.3@166.37,54.102
Digital_1: Power/Digital.3 SODIMM.244 | length 35.4
  Top Layer w0.254: SODIMM.244@112.649,56.408 112.659,56.398 125.212,56.398 v1(125.222,56.388)
  Bottom Layer w0.254: v1(125.222,56.388) 126.121,56.388 132.08,50.429 Power/Digital.3@132.08,36.957
Digital_2: Power/Digital.4 SODIMM.252 | length 31.3
  Top Layer w0.254: SODIMM.252@112.649,54.408 124.883,54.408 125.212,54.737 v1(125.349,54.737)
  Bottom Layer w0.254: v1(125.349,54.737) 127,53.086 Power/Digital.4@127,36.957